# Allegro board L60_replayed.brd
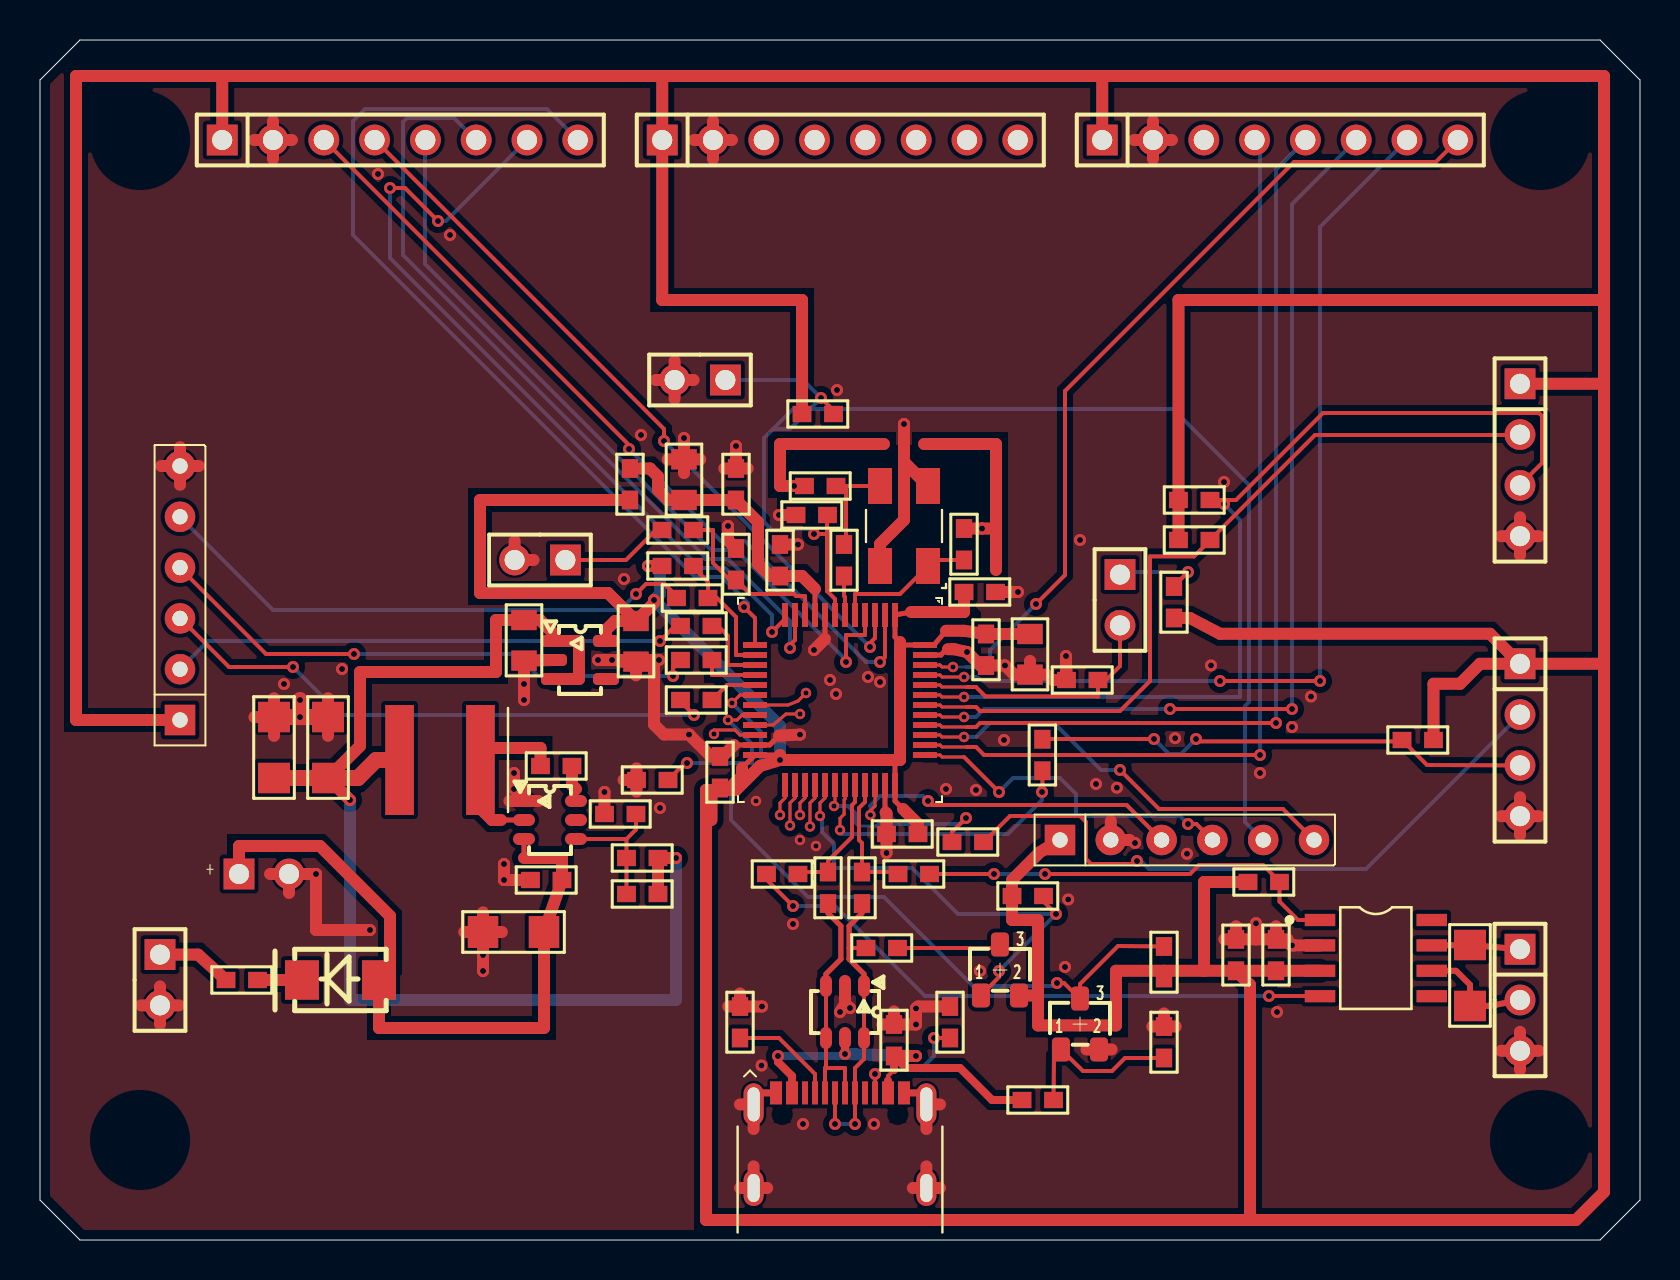
[diagram p0: board, top side]
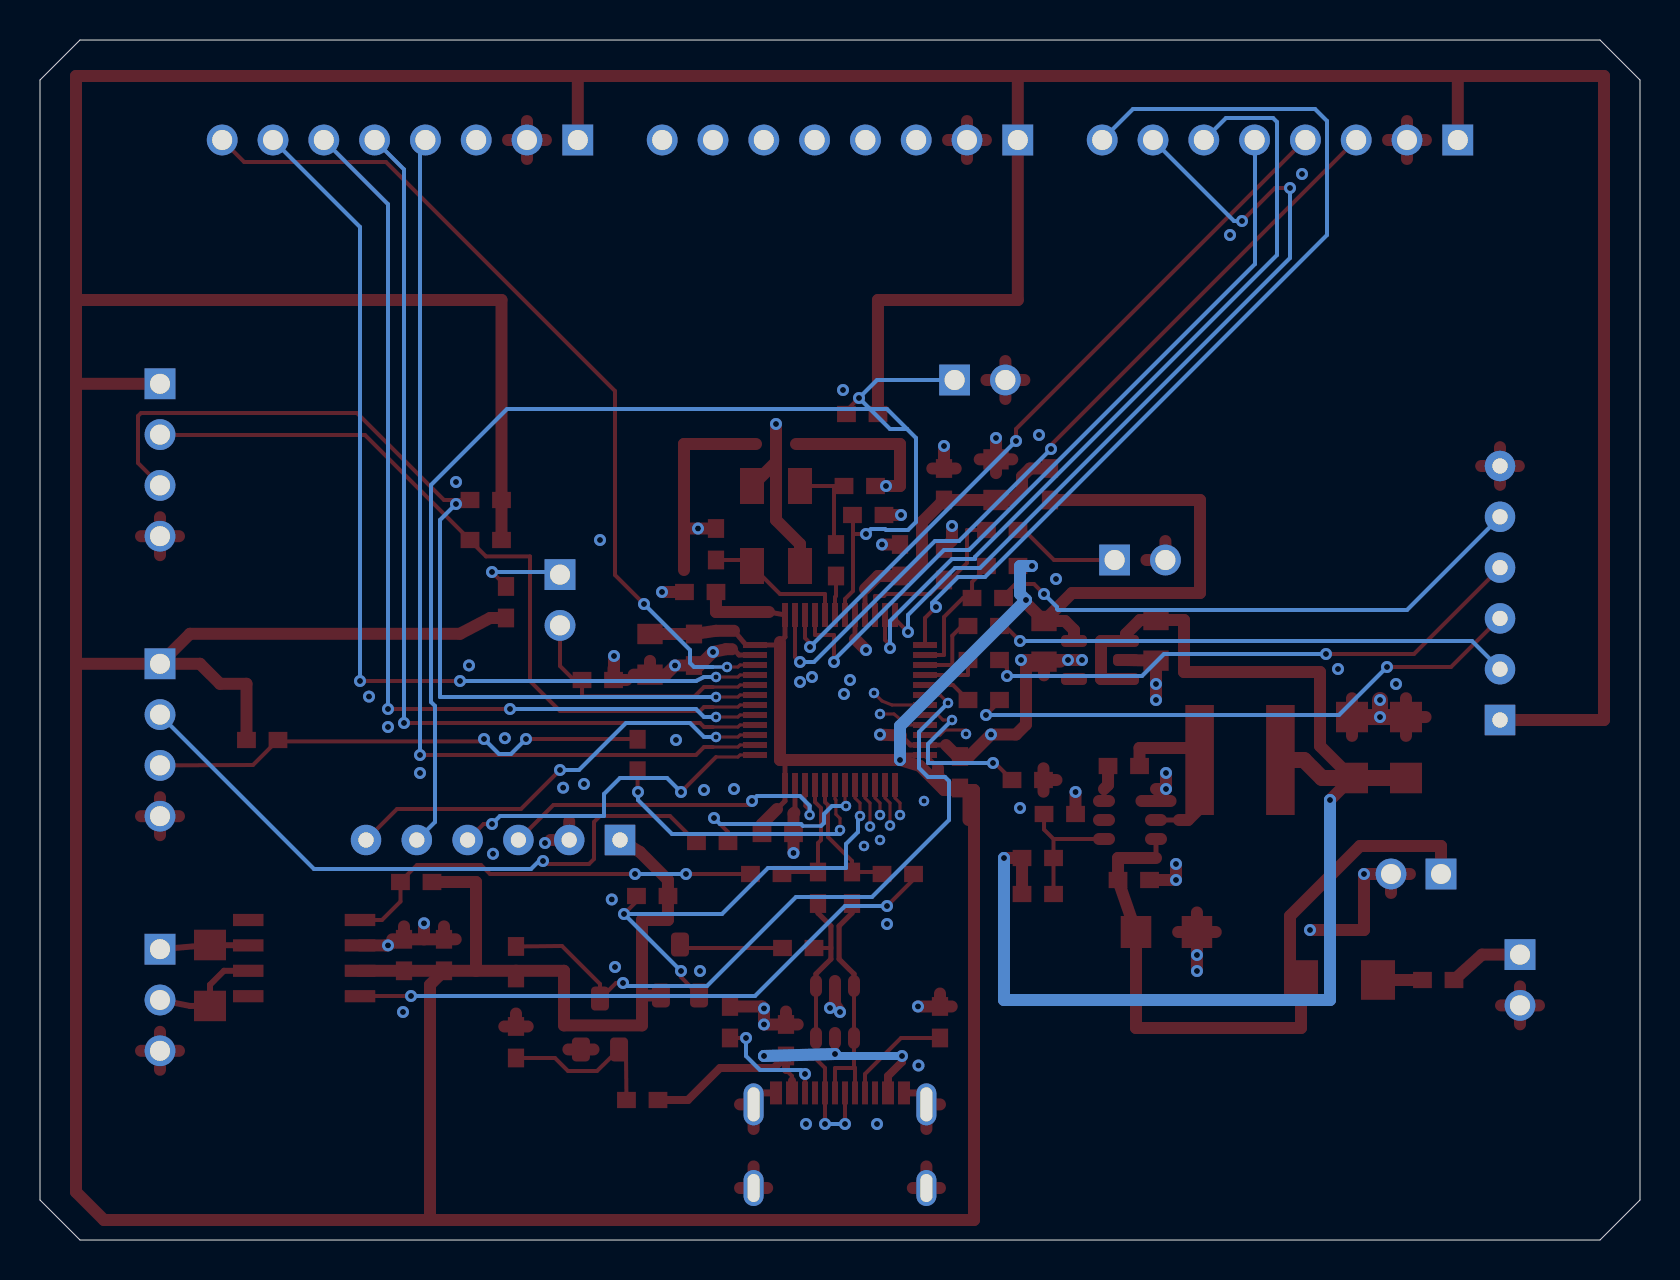
[diagram p1: board, bottom side, seen from below]

Outline 80 x 60 mm; copper layers: TOP, L2, L3, BOTTOM. Coordinates in mm from the lower left corner of the outline.
Outline path: 0,58 0,2 2,0 78,0 80,2 80,58 78,60 2,60 0,58

## Design rules (mm)
constraint set DEFAULT: 
net group DP_CAN_BUS: nets CAN_H CAN_L
net group DP_USB_MCU_SIDE: nets PA11_SHARED PA12_SHARED
net group NC_SWITCHING_E: nets BUCK_BOOT BUCK_SW
net group DP_USB_CONNECTOR: nets USB_DM
net group HI_USB_DP_P_4L: nets USB_DP
net group HI_VDDA_P: nets VDDA
net group NC_ANALOG_SENSITIVE_E: nets ADC0 ADC_IN BUCK_FB
net group NC_DIGITAL_GENERAL_E: nets BOOT0 BOOT1 BOOT_SERVICE CAN_RXD CAN_TXD GPIO_PA1 GPIO_PA2 GPIO_PA3 GPIO_PA15 GPIO_PB1 GPIO_PB4 GPIO_PB5 GPIO_PB8 GPIO_PB9 GPIO_PB10 GPIO_PB11 GPIO_PB12 GPIO_PB13 GPIO_PB14 GPIO_PB15 GPIO_PC13 GPIO_PC14 GPIO_PC15 I2C_SCL I2C_SDA NRST PA4_SPI_NSS PA5_SPI_SCK PA6_SPI_MISO PA7_SPI_MOSI PA9_UART_TX PA10_UART_RX SPI_MISO SPI_MOSI SPI_NSS SPI_SCK SWCLK SWDIO SWO UART_RX UART_TX USB_ATTACH_N USB_PULLUP_SRC VBUS_GATE VBUS_PRESENT_N
net group NC_OSCILLATOR_E: nets OSC_IN OSC_OUT XTAL_OUT
net group NC_POWER_INPUT_E: nets VIN_FUSED VIN_PROT VIN_RAW
net group NC_POWER_LV_E: nets V5
net group NC_USB_AUX_E: nets USB_CC1 USB_CC2 USB_VBUS

## Placement (name value [footprint] x y rotation side)
C1  47uF  [DE_CAPRADIAL_6D3_P2D5]  11.2 18.3 0 top
C2  22uF  [1206]  25.2 15.4 180 top
C3  100nF  [0603]  26.2 18 180 top
C4  100nF  [0603]  26.7 23.7 180 top
C5  22uF  [1206]  14.4 23.1 90 top
C6  22uF  [1206]  11.7 23.1 90 top
C7  75pF  [0603]  31 17.3 180 top
C8  2.2uF  [0805]  24.2 31 270 top
C9  4.7uF  [0805]  29.8 30.95 270 top
C10  100nF  [0603]  42.7 9.1 90 top
C11  100nF  [0603]  61.8 13.36 90 top
C12  1uF  [0603]  59.8 13.36 90 top
C13  100nF  [0603]  34 22.5 90 top
C14  100nF  [0603]  44 20.3 180 top
C15  100nF  [0603]  47.3 30.4 270 top
C16  10uF  [0805]  49.5 30.3 270 top
C17  100nF  [0603]  46.1 32.4 0 top
C18  10nF  [0603]  37 33.1 90 top
C19  100nF  [0603]  34.8 36.9 90 top
C20  2.2uF  [0805]  32.2 37 90 top
C21  100nF  [0603]  39.48 36.25 180 top
C22  16pF  [0603]  46.2 33.9 90 top
C23  16pF  [0603]  39.9 37.7 180 top
C24  100nF  [0603]  34.8 32.9 90 top
D1  SS14  [DO-214AC_SMA]  15 13 90 top
F1  500mA  [0603]  9.2 13 0 top
J1  9-16V  [PIN02_2D54MM_1X2]  6 13 0 top
J2  USB-C USB2 DEVICE  [L10_GCT_USB4105_GF_A_12LAND]  40 3.67 0 top
J3  CAN  [PIN03_2D54MM_1X3]  74 12 0 top
J4  3V3  [PIN04_2D54MM_1X4]  74 25 0 top
J5  3V3  [PIN04_2D54MM_1X4]  74 39 0 top
J6  3V3  [PIN06_2D54MM_1X6]  7 26 90 top
J7  RESET_SHUNT  [PIN02_2D54MM_1X2]  33 43 270 top
J8  BOOT0_SERVICE  [PIN02_2D54MM_1X2]  54 32 0 top
J9  SWD_LOCAL_1X6  [PIN06_2D54MM_1X6]  51 20 0 top
J10  ADC_0_TO_3V0  [PIN02_2D54MM_1X2]  25 34 270 top
J11  GPIO_3V3  [PIN08_2D54MM_1X8]  18 55 90 top
J12  GPIO_3V3  [PIN08_2D54MM_1X8]  40 55 90 top
J13  GPIO_3V3  [PIN08_2D54MM_1X8]  62 55 90 top
L1  15uH +/-20%  [DE_XAL6060_2LAND]  20 24 0 top
NOREF  -  [unnamed]  5 55 0 top
NOREF#2  -  [unnamed]  75 5 0 top
NOREF#3  -  [unnamed]  5 5 0 top
NOREF#4  -  [unnamed]  75 55 0 top
Q1  2N7002  [SOT23-3]  52 10.8 0 top
Q2  DMP2035U  [SOT23-3]  48 13.5 0 top
R1  100k  [0603]  31 19.1 180 top
R2  13.5k  [0603]  29.9 21.3 180 top
R3  5.1k  [0603]  35 10 90 top
R4  5.1k  [0603]  45.5 10 90 top
R5  22R  [0603]  41.1 18.5 270 top
R6  22R  [0603]  39.4 18.5 270 top
R7  10k  [0603]  49 7 0 top
R8  1M  [0603]  56.2 9 90 top
R9  10k  [0603]  56.2 13 90 top
R10  100k  [0603]  48.5 17.2 0 top
R11  1.5k  [0603]  42.98 14.6 180 top
R12  0R  [0603]  42.8 18.3 0 top
R13  0R  [0603]  38 18.3 180 top
R14  10k  [0603]  60.3 17.9 0 top
R15  120R  [1206]  71.5 14.75 270 top
R16  33R  [0603]  45.5 19.9 0 top
R17  0R  [0603]  50.12 23.36 90 top
R18  10k  [0603]  68 25 0 top
R19  2.2k  [0603]  56.82 35 0 top
R20  2.2k  [0603]  56.82 37 0 top
R21  33R  [0603]  33.7 30.7 180 top
R22  33R  [0603]  33.7 27 180 top
R23  33R  [0603]  33.5 32.1 180 top
R24  0R  [0603]  33.7 29 180 top
R25  10k  [0603]  31 33.7 0 top
R26  0R  [0603]  29.5 36.9 90 top
R27  10k  [0603]  38 41.3 0 top
R28  10k  [0603]  53 28 180 top
R29  10k  [0603]  31.5 23 180 top
R30  1k  [0603]  56.7 31 90 top
R31  0R  [0603]  40.2 33.1 90 top
R32  1k  [0603]  31 35.5 0 top
U1  STM32F103C8T6  [L09_STM32F103C8_LQFP48]  40 27 270 top
U2  TPS54202  [SOT23-6]  25.5 21 270 top
U3  TLV75533P  [SOT23-5]  27 29 0 top
U4  USBLC6-2SC6  [SOT23-6]  40.25 11.4 180 top
U5  TCAN332  [SO8]  64 16 0 top
Y1  8MHz  [DE_ABM3B_5032]  43.2 35.7 90 top

## Library data of the parts
C1 = DE_CAP_POL
C2 C5 C6 = DE_CAP1206
C3 C4 C7 C10-C15 C17-C19 C21-C24 = DE_CAP
C8 C9 C16 C20 = DE_CAP0805
D1 = DE_SS14_E3_61T
F1 = DE_FUSE
J1 J7 J8 J10 = DE_HEADER2
J2 = DE_USB4105_GF_A
J3 = DE_HEADER3
J4 J5 = DE_HEADER4
J6 J9 = DE_HEADER6
J11-J13 = DE_HEADER8
L1 = DE_XAL6060_153MEC
Q1 = DE_2N7002
Q2 = DE_DMP2035U_7
R1-R14 R16-R32 = DE_RES
R15 = DE_RES1206
U1 = DE_STM32F103C8T6
U2 = DE_TPS54202DDCR
U3 = DE_TLV75533PDBVR
U4 = DE_USBLC6_2SC6
U5 = DE_TCAN332DR
Y1 = DE_XTAL_ABM3B

## Footprints (pads in the part's own frame, mm; a bottom-side part is the same pattern mirrored in y, then rotated)
0603
  rect 0.94x0.813 smd: 1(0.102,0) 2(1.676,0)
0805
  rect 1.016x1.27 smd: 1(0,0) 2(2.032,0)
1206
  rect 1.524x1.6 smd: 1(0,0) 2(3.048,0)
DE_ABM3B_5032
  rect 1.8x1.2 smd: 1(-2,-1.2) 2(2,-1.2) 3(2,1.2) 4(-2,1.2)
DE_CAPRADIAL_6D3_P2D5
  rect 1.54x1.54 hole 1: 1(-1.25,0)
  round 1.54 hole 1: 2(1.25,0)
DE_XAL6060_2LAND
  rect 1.43x5.5 smd: 1(2.02,0) 2(-2.02,0)
DO-214AC_SMA
  rect 1.981x1.702 smd: 1(0,-1.95) 2(0,1.9)
L09_STM32F103C8_LQFP48
  rect 1.2x0.3 smd: 1(-4.25,2.75) 2(-4.25,2.25) 3(-4.25,1.75) 4(-4.25,1.25) 5(-4.25,0.75) 6(-4.25,0.25) 7(-4.25,-0.25) 8(-4.25,-0.75) 9(-4.25,-1.25) 10(-4.25,-1.75) 11(-4.25,-2.25) 12(-4.25,-2.75) 25(4.25,-2.75) 26(4.25,-2.25) 27(4.25,-1.75) 28(4.25,-1.25) 29(4.25,-0.75) 30(4.25,-0.25) 31(4.25,0.25) 32(4.25,0.75) 33(4.25,1.25) 34(4.25,1.75) 35(4.25,2.25) 36(4.25,2.75)
  rect 0.3x1.2 smd: 13(-2.75,-4.25) 14(-2.25,-4.25) 15(-1.75,-4.25) 16(-1.25,-4.25) 17(-0.75,-4.25) 18(-0.25,-4.25) 19(0.25,-4.25) 20(0.75,-4.25) 21(1.25,-4.25) 22(1.75,-4.25) 23(2.25,-4.25) 24(2.75,-4.25) 37(2.75,4.25) 38(2.25,4.25) 39(1.75,4.25) 40(1.25,4.25) 41(0.75,4.25) 42(0.25,4.25) 43(-0.25,4.25) 44(-0.75,4.25) 45(-1.25,4.25) 46(-1.75,4.25) 47(-2.25,4.25) 48(-2.75,4.25)
L10_GCT_USB4105_GF_A_12LAND
  round 0 hole 0.65 unplated: (-2.89,2.605) (2.89,2.605)
  rect 0.6x1.15 smd: A1_B12(-3.2,3.68) A4_B9(-2.4,3.68) B1_A12(3.2,3.68) B4_A9(2.4,3.68)
  rect 0.3x1.15 smd: A5(-1.25,3.68) A6(-0.25,3.68) A7(0.25,3.68) A8(1.25,3.68) B5(1.75,3.68) B6(0.75,3.68) B7(-0.75,3.68) B8(-1.75,3.68)
  oval 1x2.1 hole 0.6x1.7: SH1(-4.32,3.105) SH2(4.32,3.105)
  oval 1x1.8 hole 0.6x1.4: SH3(-4.32,-1.075) SH4(4.32,-1.075)
PIN02_2D54MM_1X2
  rect 1.54x1.54 hole 1: 1(0,1.27)
  round 1.54 hole 1: 2(0,-1.27)
PIN03_2D54MM_1X3
  rect 1.54x1.54 hole 1: 1(0,2.54)
  round 1.54 hole 1: 2(0,0) 3(0,-2.54)
PIN04_2D54MM_1X4
  rect 1.54x1.54 hole 1: 1(0,3.81)
  round 1.54 hole 1: 2(0,1.27) 3(0,-1.27) 4(0,-3.81)
PIN06_2D54MM_1X6
  rect 1.524x1.524 hole 0.762: 1(0,0)
  round 1.524 hole 0.762: 2(2.54,0) 3(5.08,0) 4(7.62,0) 5(10.16,0) 6(12.7,0)
PIN08_2D54MM_1X8
  rect 1.54x1.54 hole 1: 1(0,8.89)
  round 1.54 hole 1: 2(0,6.35) 3(0,3.81) 4(0,1.27) 5(0,-1.27) 6(0,-3.81) 7(0,-6.35) 8(0,-8.89)
SO8
  rect 1.524x0.61 smd: 1(0,0) 2(0,-1.27) 3(0,-2.54) 4(0,-3.81) 5(5.588,-3.81) 6(5.588,-2.54) 7(5.588,-1.27) 8(5.588,0)
SOT23-3
  rrect 0.9x1.2 smd: 1(-0.953,-1.272) 2(0.953,-1.272) 3(0,1.272)
SOT23-5
  rrect 1.3x0.6 smd: 1(-1.3,0.95) 2(-1.3,0) 3(-1.3,-0.95) 4(1.3,-0.95) 5(1.3,0.95)
SOT23-6
  oval 0.6x1.1 smd: 1(-0.95,-1.3) 2(0,-1.3) 3(0.95,-1.3) 4(0.95,1.3) 5(0,1.3) 6(-0.95,1.3)
unnamed
  round 0 hole 2 unplated: (0,0)

## Nets
GND: C1.2 C2.2 C3.2 C5.2 C6.2 C8.2 C9.2 C10.2 C11.2 C12.2 C13.2 C14.2 C15.2 C16.2 C17.2 C18.2 C19.2 C20.2 C21.2 C22.2 C23.2 C24.2 J1.2 J2.A1_B12 J2.B1_A12 J2.SH1 J2.SH2 J2.SH3 J2.SH4 J3.3 J4.4 J5.4 J6.6 J7.2 J9.2 J10.2 J11.2 J12.2 J13.2 Q1.2(S) R2.2 R3.2 R4.2 R8.2 R28.2 R29.2 U1.8 U1.23 U1.35 U1.47(VSS_3) U2.1 U3.2 U4.2 U5.2 Y1.2 Y1.4
V3V3: C9.1 C11.1 C12.1 C13.1 C14.1 C15.1 C16.1 C17.1 J4.1 J5.1 J6.1 J9.1 J11.1 J12.1 J13.1 Q2.2(S) R9.1 R10.1 R14.1 R18.2 R19.1 R20.1 R25.1 R26.1 R27.1 R30.1 U1.1 U1.24 U1.36 U1.48 U3.5(OUT) U5.3(VCC)
V5: C5.1 C6.1 C7.1 C8.1 L1.2 R1.1 U3.1 U3.3
VBUS_GATE: Q1.1 R7.2 R8.1
VBUS_PRESENT_N: Q1.3 R9.2 U1.18
VDDA: C18.1 C19.1 C20.1 R26.2 U1.9
VIN_FUSED: D1.2 F1.2
VIN_PROT: C1.1(P) C2.1 C3.1 D1.1(K) U2.3(VIN)
VIN_RAW: F1.1 J1.1
ADC0: C24.1 R32.2 U1.10
ADC_IN: J10.1 R32.1
BOOT0: J8.2 R28.1 U1.44
BOOT1: R29.1 U1.20
BOOT_SERVICE: J8.1 R30.2
BUCK_BOOT: C4.1 U2.6
BUCK_FB: C7.2 R1.2 R2.1 U2.4
BUCK_SW: C4.2 L1.1(SW_END) U2.2
CAN_H: J3.1 R15.1 U5.7
CAN_L: J3.2 R15.2 U5.6
CAN_RXD: R13.2 U5.4
CAN_TXD: R12.2 R14.2 U5.1
GPIO_PA1: J11.6 U1.11
GPIO_PA2: J11.7 U1.12
GPIO_PA3: J11.8 U1.13
GPIO_PA15: J13.4 U1.38
GPIO_PB1: J12.3 U1.19
GPIO_PB4: J13.5 U1.40
GPIO_PB5: J13.6 U1.41
GPIO_PB8: J13.7 U1.45
GPIO_PB9: J13.8 U1.46
GPIO_PB10: J12.4 U1.21
GPIO_PB11: J12.5 U1.22
GPIO_PB12: J12.6 U1.25
GPIO_PB13: J12.7 U1.26
GPIO_PB14: J12.8 U1.27
GPIO_PB15: J13.3 U1.28
GPIO_PC13: J11.3 U1.2
GPIO_PC14: J11.4 U1.3
GPIO_PC15: J11.5 U1.4
I2C_SCL: J5.2 R19.2 U1.42
I2C_SDA: J5.3 R20.2 U1.43
NRST: C21.1 J7.1 J9.5 R27.2 U1.7
OSC_IN: C22.1 U1.5 Y1.1
OSC_OUT: R31.1 U1.6
PA4_SPI_NSS: R23.1 R25.2 U1.14
PA5_SPI_SCK: R21.1 U1.15
PA6_SPI_MISO: R24.1 U1.16
PA7_SPI_MOSI: R22.1 U1.17
PA9_UART_TX: R16.1 U1.30
PA10_UART_RX: R17.1 U1.31
PA11_SHARED: R6.1 R13.1 U1.32
PA12_SHARED: R5.1 R12.1 U1.33
SPI_MISO: J6.4 R24.2
SPI_MOSI: J6.3 R22.2
SPI_NSS: J6.5 R23.2
SPI_SCK: J6.2 R21.2
SWCLK: J9.4 U1.37
SWDIO: J9.3 U1.34
SWO: J9.6 U1.39
UART_RX: J4.3 R17.2 R18.1
UART_TX: J4.2 R16.2
USB_ATTACH_N: Q2.1 R10.2 U1.29
USB_CC1: J2.A5 R3.1
USB_CC2: J2.B5 R4.1
USB_DM: J2.A7 J2.B7 R6.2 U4.3 U4.4
USB_DP: J2.A6 J2.B6 R5.2 R11.2 U4.1 U4.6
USB_PULLUP_SRC: Q2.3 R11.1
USB_VBUS: C10.1 J2.A4_B9 J2.B4_A9(VBUS2) R7.1 U4.5(VBUS)
XTAL_OUT: C23.1 R31.2 Y1.3(X2)

Pads without a net: J2 A8 B8; U2 5; U3 4; U5 5 8

## Via types
v1: diameter 0.52, hole 0.26, TOP to BOTTOM, 21 vias
v2: diameter 0.6, hole 0.3, TOP to BOTTOM, 129 vias

## Routing (per net, layer and track width the routed paths; a pad name or vN(x,y) marks a point on that pad's centre or on a via; arc(x,y) is an arc through that point)
GND: length 234.7
  TOP w0.25: 34.7,24.75 U1.23 36.48,24.75 36.95,25.22 ; 39.25,30.05 U1.8 ; 42.28,21.37 42.25,21.4 U1.35 ; U1.47 45.05,29.25 45.3,29.54 45.4,29.54 ; 24.2,22.55 U2.1
  TOP w0.35: 44.1,7.36 J2.B1_A12 ; 35.9,7.36 J2.A1_B12
  TOP w0.6: C16.2 49.5,28.95 ; C16.2 48.71,28.27 v2(48.25,28.73) C15.2 47.02,28.73 v2(46.35,29.4) 45.7,29.54 45.4,29.54 ; C16.2 50.31,28.27 ; 29.8,29 30.7,29 30.7,25.77 31.2,25.27 v2(32.45,25.27) 33.55,24.17 C13.2 34,24.05 34.7,24.75 ; 29.8,29 C9.2 ; 29.8,29 v2(28.6,29) v2(27.9,29) ; 14.4,27.09 C5.2 14.4,25.21 ; 24.2,22.55 v2(23.7,22.55) v2(23.7,23.35) ; 62.7,14.73 v2(62.6,14.73) ; 62.7,14.73 U5.2 ; 62.7,14.73 C11.2 ; v2(42.33,19.35) C14.2 42.33,21.32 42.28,21.37 ; 28.99,28.92 C9.2 ; C9.2 29.8,28.23 ; C9.2 30.61,28.92 ; J2.SH1 35.68,7.36 35.9,7.36 ; J2.SH1 35,6.78 ; J2.SH1 35.68,5.55 ; 32.2,38.35 C20.2 ; C20.2 33.01,39.03 ; C20.2 v2(32.2,40.1) ; C20.2 31.39,39.03 ; v2(34.4,35.7) 34.4,34.97 C24.2 ; J3.3 74.95,9.46 ; J3.3 74,10.41 ; J3.3 74,8.51 ; J3.3 73.05,9.46 ; 74,20.24 J4.4 ; J4.4 74.95,21.19 ; J4.4 73.05,21.19 ; J4.4 74,22.14 ; C11.2 60.8,15.03 ; C11.2 61.8,15.68 ; C11.2 62.38,15.03 ; 60.8,15.03 v2(60.8,15.83) ; 60.8,15.03 C12.2 ; C22.2 v2(47.1,35.57) 47.8,35.57 ; v2(23.2,18.8) v2(23.2,18) C3.2 ; 34.42,11.68 R3.2 ; R3.2 35,12.32 ; R3.2 v2(36.1,11.68) ; J2.SH2 44.32,7.36 44.1,7.36 ; J2.SH2 45,6.78 ; J2.SH2 44.32,5.55 ; C10.2 42.7,11.42 ; C10.2 42.12,10.78 ; C10.2 v2(43.8,10.78) v2(43.8,11.58) 43.9,11.68 R4.2 ; 5.05,11.73 J1.2 ; J1.2 6,12.68 ; J1.2 6,10.78 ; J1.2 6.95,11.73 ; R28.2 51.3,28.02 v2(51.3,29.2) ; R28.2 51.32,28.58 ; R28.2 50.68,28 ; C2.2 v2(22.15,14.25) v2(22.15,13.45) ; C2.2 23.09,15.4 ; C2.2 21.21,15.4 ; C2.2 22.15,16.38 ; 10.7,55 J11.2 ; J11.2 11.65,54.05 ; J11.2 11.65,55.95 ; J11.2 12.6,55 ; J2.SH3 35.68,3.68 ; J2.SH3 36.36,2.6 ; J2.SH3 35,2.6 ; 32.7,55 J12.2 ; J12.2 33.65,54.05 ; J12.2 34.6,55 ; J12.2 33.65,55.95 ; 24.68,34 J10.2 23.73,34.95 ; 11.7,25.21 C6.2 ; C6.2 10.72,26.15 ; C6.2 11.7,27.09 ; 42.2,39.8 37,39.8 37,37.7 v2(37.7,37.7) C23.2 ; C12.2 59.22,15.03 ; C12.2 59.8,15.68 ; 74,34.24 J5.4 ; J5.4 74,36.14 ; J5.4 73.05,35.19 ; J5.4 74.95,35.19 ; 53.58,9.53 Q1.2 52.32,9.53 ; 43.64,2.6 J2.SH4 ; J2.SH4 45,2.6 ; J2.SH4 44.32,3.68 ; 47.8,35.57 47.8,33.5 ; 47.8,35.57 47.8,39.8 44.2,39.8 ; J7.2 31.73,43.95 ; J7.2 30.78,43 ; J7.2 32.68,43 ; J7.2 31.73,42.05 ; v2(38.7,29.5) 39.25,30.05 ; 12.45,17.35 C1.2 ; C1.2 v2(13.8,18.3) 13.8,15.5 v2(16.5,15.5) ; C1.2 11.5,18.3 ; J13.2 56.6,55 ; J13.2 55.65,55.95 ; J13.2 55.65,54.05 ; J13.2 54.7,55 ; v2(40,11.4) 40.25,11.8 ; 40.25,11.8 U4.2 ; 40.25,11.8 v2(40.5,11.6) ; 29.83,22.42 R29.2 ; R29.2 29.83,23.58 ; R29.2 29.18,23 ; 43.2,38.9 Y1.2 ; 43.2,38.9 v2(43.2,40.8) ; 43.2,38.9 43.2,36 42,34.8 Y1.4 ; R8.2 56.78,10.68 ; R8.2 56.2,11.32 ; R8.2 55.62,10.68 ; 23.47,21.95 U2.1 24.93,21.95 ; U3.2 C8.2 v2(24.2,27.8) v2(24.2,27) ; C17.2 v2(48.9,32.4) ; C19.2 35.38,38.57 ; C19.2 34.22,38.57 ; C19.2 v2(34.8,39.7) ; 53.54,20.94 J9.2 54.48,20 ; C21.2 v2(36.95,36.25) ; v2(38,25.27) 36.95,25.22 ; C18.2 v2(37.9,34.77) ; 7,37.76 J6.6 ; J6.6 7,39.64 ; J6.6 7.94,38.7 ; J6.6 6.06,38.7 ; R2.2 v2(28.22,22.4)
  TOP w0.8: C5.2 v2(13,26.15) ; v2(13,26.15) v2(13,27) ; v2(13,26.15) C6.2
  L2 w0.6: J11.2 12.6,55 ; J11.2 11.65,55.95 ; J11.2 10.7,55 ; J11.2 11.65,54.05 ; 44.32,1.52 J2.SH4 ; J2.SH4 44.32,3.68 ; J2.SH4 45,2.6 ; J2.SH4 43.64,2.6 ; 6.06,38.7 J6.6 ; J6.6 7,37.76 ; J6.6 7,39.64 ; J6.6 7.94,38.7 ; C1.2 13.4,18.3 ; C1.2 12.45,17.35 ; C1.2 11.5,18.3 ; C1.2 12.45,19.25 ; J2.SH2 44.32,8.01 ; J2.SH2 43.64,6.78 ; J2.SH2 44.32,5.55 ; J2.SH2 45,6.78 ; J4.4 74.95,21.19 ; J4.4 74,20.24 ; J4.4 74,22.14 ; J4.4 73.05,21.19 ; 5.05,11.73 J1.2 ; J1.2 6,10.78 ; J1.2 6,12.68 ; J1.2 6.95,11.73 ; 23.73,33.05 J10.2 ; J10.2 23.73,34.95 ; J10.2 22.78,34 ; J10.2 24.68,34 ; J3.3 74.95,9.46 ; J3.3 74,8.51 ; J3.3 73.05,9.46 ; J3.3 74,10.41 ; 55.65,54.05 J13.2 ; J13.2 56.6,55 ; J13.2 55.65,55.95 ; J13.2 54.7,55 ; 35,2.6 J2.SH3 ; J2.SH3 36.36,2.6 ; J2.SH3 35.68,3.68 ; J2.SH3 35.68,1.52 ; J12.2 34.6,55 ; J12.2 33.65,54.05 ; J12.2 33.65,55.95 ; J12.2 32.7,55 ; J5.4 74,36.14 ; J5.4 74,34.24 ; J5.4 74.95,35.19 ; J5.4 73.05,35.19 ; 35.68,5.55 J2.SH1 ; J2.SH1 35,6.78 ; J2.SH1 36.36,6.78 ; J2.SH1 35.68,8.01 ; 31.73,42.05 J7.2 ; J7.2 30.78,43 ; J7.2 32.68,43 ; J7.2 31.73,43.95 ; J9.2 54.48,20 ; J9.2 52.6,20 ; J9.2 53.54,20.94 ; J9.2 53.54,19.06
  vias: v1(35.8,21.95) v1(38,20) v1(38.8,19.7) v2(12.2,27.8) v2(15.1,28.55) v2(16.9,53.3) v2(20.5,50.25) v2(29.2,33.05) v2(30.05,40.25) v2(30.95,29) v2(31,21.6) v2(36.08,8.72) v2(37.65,15.8) v2(38.15,5.8) v2(39.5,28) v2(39.8,27.3) v2(39.85,42.5) v2(41.4,28.15) v2(41.7,5.8) v2(42,27.9) v2(45.3,22.55) v2(46.8,22.5) v2(47,13.45) v2(48.2,25) v2(51.25,13.65) v2(51.41,17.03) v2(52,35) v2(52.8,22.8) v2(53.84,22.61) v2(54.75,19.85) v2(56.76,25.09) v2(57.35,19.31) v2(58.55,28.73) v2(59.2,37.9) v2(61,23.35) v2(61.85,11.4) v2(62.6,25.65) v2(63.55,27.17)
V3V3: length 486.7
  TOP w0.25: 43,29.75 U1.48 44.7,29.75 45.3,30.46 ; 37,24.25 U1.24 35.1,23.6 ; 43.15,21.55 42.75,21.95 U1.36 42.75,24 ; 43.55,31.4 U1.1 42.75,30.15 43,29.9
  TOP w0.6: 49.9,12.23 Q2.2 ; 49.9,12.23 49.9,10.73 53.8,10.73 53.8,13.46 56.2,13.46 ; 49.9,12.23 49.9,16 48.6,16 R10.1 48.6,18 50,19.4 J9.1 ; v2(37,24) 36,23.7 34.8,22.5 33.3,22.5 ; v2(37,24) 37,24.25 ; v2(37,24) 43,24 43,29.9 ; C16.1 C15.1 46.2,30.46 45.3,30.46 ; R18.2 69.68,27.81 71,27.81 72,28.81 J4.1 ; 78.2,47 78.2,42.81 ; 78.2,47 78.2,58.2 53.11,58.2 ; 78.2,47 56.93,47 R20.1 R19.1 ; 78.2,42.81 78.2,28.81 ; 78.2,42.81 J5.1 ; C17.1 46.2,31.4 43.55,31.4 ; 31.11,58.2 J12.1 31.11,47 38.1,47 R27.1 ; 31.11,58.2 53.11,58.2 ; 31.11,58.2 9.11,58.2 ; 58.2,13.46 56.2,13.46 ; 58.2,13.46 58.2,17.9 R14.1 ; 58.2,13.46 C12.1 ; 56.2,13.46 R9.1 ; R26.1 22,37 22,32.35 28.4,32.35 C9.1 ; 33.3,22.5 33.3,1 60.5,1 ; 33.3,22.5 33.57,22.23 33.57,21 ; J6.1 1.8,26 1.8,58.2 9.11,58.2 ; C12.1 C11.1 U5.3 ; C12.1 60.5,12.76 60.5,1 ; 43.15,21.55 43.9,20.8 C14.1 ; 78.2,28.81 78.2,2.4 76.8,1 60.5,1 ; 78.2,28.81 J4.1 ; J4.1 72.5,30.31 59,30.31 57.49,31.1 R30.1 ; C9.1 30.7,31.85 v2(30.7,32) ; C9.1 28.75,30.95 28.3,30.5 U3.5 ; v2(30.4,33.7) R25.1 ; 53.11,58.2 J13.1 ; 9.11,58.2 J11.1 ; C13.1 34.5,22.6 35.1,23.2 35.1,23.6
  L3 w0.6: J11.1 9.11,55.95 ; J11.1 8.16,55 ; J11.1 9.11,54.05 ; J11.1 10.06,55 ; J4.1 74,29.76 ; J4.1 74,27.86 ; J4.1 74.95,28.81 ; J4.1 73.05,28.81 ; 6.06,26 J6.1 ; J6.1 7,26.94 ; J6.1 7,25.06 ; J6.1 7.94,26 ; J5.1 74,43.76 ; J5.1 74.95,42.81 ; J5.1 74,41.86 ; J5.1 73.05,42.81 ; 52.16,55 J13.1 ; J13.1 54.06,55 ; J13.1 53.11,54.05 ; J13.1 53.11,55.95 ; 51,19.06 J9.1 ; J9.1 51,20.94 ; J9.1 51.94,20 ; J9.1 50.06,20 ; J12.1 32.06,55 ; J12.1 31.11,54.05 ; J12.1 31.11,55.95 ; J12.1 30.16,55
  BOTTOM w0.6: v2(37,24) 37,25.7 v2(30.7,32) 31,32.3 31,33.7 v2(30.4,33.7)
V5: length 67.6
  TOP w0.6: v2(15.5,22) C5.1 16,24.7 16,28.4 22.8,28.4 22.8,31 C8.1 25,31 25.7,30.3 U3.1 26.95,29.95 26.95,28.05 U3.3 ; C7.1 R1.1 v2(31.8,19.1)
  TOP w0.8: C6.1 C5.1 15.9,23.1 16.8,24 L1.2
  BOTTOM w0.6: v2(31.8,19.1) 31.8,12 15.5,12 v2(15.5,22)
VBUS_GATE: length 8.5
  TOP w0.2: R7.2 50.7,9.2 Q1.1 52.15,8.45 53.6,8.45 54.25,9.1 R8.1
VBUS_PRESENT_N: length 35.9
  TOP w0.16: v1(34.6,26.85) 35,27.25 U1.18
  TOP w0.2: v2(50.85,12.85) 51.2,12.85 52,12.05 Q1.3 52,12.8 53.9,14.7 R9.2
  BOTTOM w0.2: v2(50.85,12.85) 50.7,12.7 46.65,12.7 42.2,17.15 38.4,17.15 34.55,21 34.55,22.95 34.75,23.15 35.6,23.15 36.05,23.6 36.05,25.4 v1(34.6,26.85)
VDDA: length 14.7
  TOP w0.25: U1.9 38.75,32.55
  TOP w0.6: R26.2 30.5,38.57 30.9,38.17 30.9,37.5 31.4,37 C20.1 C19.1 35.9,35.9 35.9,33.8 36.5,33.2 C18.1 38.1,33.2 38.75,32.55
VIN_FUSED: length 2.2
  TOP w0.6: F1.2 D1.2
VIN_PROT: length 36
  TOP w0.25: U2.3 24.2,19.1
  TOP w0.6: 24.2,19.1 26.1,19.1 C3.1 C2.1 25.2,10.6 16.95,10.6 D1.1 17.5,13.55 17.5,16.2 14,19.7 9.95,19.7 C1.1
VIN_RAW: length 3.8
  TOP w0.6: F1.1 7.9,14.27 J1.1
ADC0: length 8.9
  TOP w0.2: U1.10 38.25,32.2 37.8,32.2 37.7,32.3 35.5,32.3 C24.1 34.5,33 33.65,33.85 33.65,35.5 R32.2
ADC_IN: length 5.5
  TOP w0.2: R32.1 30.8,35.5 29.3,34 J10.1
BOOT0: length 13.1
  TOP w0.16: 46.35,27.65 45.1,27.65 45,27.75 44.65,27.75
  TOP w0.2: 44.65,27.75 U1.44 ; 46.35,27.65 46.8,27.65 47.27,27.18 52.9,27.18 R28.1 53.3,28 54,28.7 J8.2
BOOT1: length 8.7
  TOP w0.16: v1(34.4,26) 34.85,26 35.1,26.25 U1.20
  TOP w0.2: v2(32.35,23.85) 32.25,23.85 R29.1
  BOTTOM w0.2: v2(32.35,23.85) 35.6,23.85 35.6,24.8 v1(34.4,26)
BOOT_SERVICE: length 4.5
  TOP w0.2: v2(57.4,33.4) 56.7,32.7 R30.2
  BOTTOM w0.2: J8.1 54,33.25 54.15,33.4 v2(57.4,33.4)
BUCK_BOOT: length 1.8
  TOP w0.25: U2.6 26.8,22.55
  TOP w0.6: 26.8,22.55 26.6,22.75 C4.1
BUCK_FB: length 6.7
  TOP w0.2: 29.32,20.05 R1.2 C7.2 ; 29.32,20.05 29.8,20.52 R2.1 ; 29.32,20.05 U2.4
BUCK_SW: length 9.3
  TOP w0.25: U2.2 23.05,21
  TOP w0.6: 23.05,21 22.6,21 22.02,21.58 L1.1 22.02,24.6 25.02,24.6 C4.2
CAN_H: length 4.4
  TOP w0.3: U5.7 R15.1 J3.1
CAN_L: length 5.8
  TOP w0.3: U5.6 70.8,13.46 71.5,12.76 R15.2 72.5,11.7 J3.2
CAN_RXD: length 30.4
  TOP w0.2: v2(61.45,12.2) 64,12.2 U5.4 ; R13.2 36.3,18.3 36.3,18.05 v2(37.65,16.7)
  BOTTOM w0.2: v2(37.65,16.7) 39.75,16.7 44.25,12.2 v2(61.45,12.2)
CAN_TXD: length 21.5
  TOP w0.2: R12.2 v2(47.7,18.3) ; U5.1 62.9,16 61.98,16.92 R14.2 62,17.9 61.15,18.75 57.95,18.75 57.5,18.3 v2(50.25,18.3)
  BOTTOM w0.2: v2(47.7,18.3) v2(50.25,18.3)
GPIO_PA1: length 40.9
  TOP w0.2: v2(37.5,29.6) 37.5,29.75 37.75,30 U1.11
  BOTTOM w0.2: v2(37.5,29.6) 37.5,30.95 34.4,34.05 33.25,34.05 33.25,34.15 18.15,49.25 18.15,55.9 18.35,56.1 20.7,56.1 21.8,55 J11.6
GPIO_PA2: length 41.2
  TOP w0.2: v2(36.6,30.4) 37.25,31.05 U1.12 ; v2(19.9,50.95) 18.25,52.6 v2(17.5,52.6)
  BOTTOM w0.2: J11.7 20.3,50.95 v2(19.9,50.95) ; v2(36.6,30.4) 36.6,31.25 34.25,33.6 33,33.6 17.5,49.1 v2(17.5,52.6)
GPIO_PA3: length 47.6
  TOP w0.2: v2(35.2,31.65) 35.75,31.1 U1.13
  BOTTOM w0.2: v2(35.2,31.65) 35.4,31.85 34.1,33.15 32.75,33.15 15.65,50.25 15.65,55.95 16.25,56.55 25.35,56.55 26.9,55 J11.8
GPIO_PA15: length 47.8
  TOP w0.16: 46.35,24.65 45.1,24.65 45,24.75 44.65,24.75
  TOP w0.2: 46.35,24.65 46.8,24.65 47.2,24.25 v2(61,24.25) ; 44.65,24.75 U1.38
  BOTTOM w0.2: J13.4 61,54.73 v2(61,24.25)
GPIO_PB1: length 2.8
  TOP w0.16: U1.19 37.4,26.75 37.9,26.95 v1(38.3,27.35)
GPIO_PB4: length 47.4
  TOP w0.16: 44.65,25.75 45,25.75 45.1,25.65 46.35,25.65
  TOP w0.2: 44.65,25.75 U1.40 ; 46.35,25.65 46.8,25.65 47,25.85 v2(61.8,25.85)
  BOTTOM w0.2: J13.5 61.8,53.53 v2(61.8,25.85)
GPIO_PB5: length 48.3
  TOP w0.16: U1.41 45,26.25 45.1,26.15 v1(46.2,26.15)
  TOP w0.2: v2(56.5,26.55) v2(62.6,26.55)
  BOTTOM w0.2: v1(46.2,26.15) 46.8,26.15 47.2,26.55 v2(56.5,26.55) ; v2(62.6,26.55) 62.6,51.79 J13.6
GPIO_PB8: length 48.7
  TOP w0.16: v1(46.2,28.15) 45.1,28.15 45,28.25 U1.45
  TOP w0.2: v2(59,27.95) v2(64,27.95)
  BOTTOM w0.2: v2(59,27.95) 47.2,27.95 46.8,28.15 v1(46.2,28.15) ; v2(64,27.95) 64,50.65 J13.7
GPIO_PB9: length 43.4
  TOP w0.16: v1(45.65,28.65) 45.1,28.65 45,28.75 U1.46
  TOP w0.2: v2(49.8,31.8) 51.25,33.25 51.25,42.45 62.7,53.9 69.79,53.9 J13.8
  BOTTOM w0.16: v1(45.65,28.65) 46.35,28.65
  BOTTOM w0.2: 46.35,28.65 47.3,28.65 47.5,28.85 47.5,29.5 v2(49.8,31.8)
GPIO_PB10: length 2.5
  TOP w0.16: U1.21 36.65,25.75 37.3,26.3 v1(38,26.3)
GPIO_PB11: length 2.4
  TOP w0.16: v1(33.7,25.3) 33.7,25.5 34.75,25.5 35,25.25 U1.22
GPIO_PB12: length 1.6
  TOP w0.16: U1.25 37.25,22.1 37,21.85 v1(37,21.25)
GPIO_PB13: length 2.1
  TOP w0.16: U1.26 37.75,22.1 37.5,21.85 v1(37.5,20.73)
GPIO_PB14: length 1.6
  TOP w0.16: U1.27 38.25,22.1 38,21.85 v1(38,21.25)
GPIO_PB15: length 2.2
  TOP w0.16: v1(38.5,20.68) 38.5,21.85 38.75,22.1 U1.28
GPIO_PC13: length 41.2
  TOP w0.2: U1.2 42.25,29.15 v2(42,28.9) ; J11.3 14.2,55 29.45,39.75 v2(29.45,39.55)
  BOTTOM w0.2: v2(29.45,39.55) 34.05,34.95 35.25,34.95 41.3,28.9 v2(42,28.9)
GPIO_PC14: length 37.3
  TOP w0.2: v2(41.5,29.65) 41.5,29.85 41.75,30.1 U1.3 ; v2(31.2,39.95) 31.2,40.55 16.75,55 J11.4
  BOTTOM w0.2: v2(31.2,39.95) v2(41.5,29.65)
GPIO_PC15: length 38.9
  TOP w0.2: U1.4 41.25,30.25 40.3,30.25 v2(40.3,28.9)
  BOTTOM w0.2: J11.5 19.25,55 19.25,48.8 33.55,34.5 34.8,34.5 40.3,29 v2(40.3,28.9)
I2C_SCL: length 39.3
  TOP w0.16: 46.35,26.65 45.1,26.65 45,26.75 44.65,26.75
  TOP w0.2: 46.35,26.65 46.8,26.65 47,26.45 54,26.45 55.5,27.95 55.5,34.18 57.7,34.18 58.5,34.98 R19.2 63.75,40.25 74,40.25 J5.2 ; 44.65,26.75 U1.42
I2C_SDA: length 48.4
  TOP w0.16: v1(46.2,27.15) 45.1,27.15 45,27.25 U1.43
  TOP w0.2: 59,37 59.8,37 64.15,41.35 74.95,41.35 75.1,41.2 75.1,38.85 74,37.75 J5.3 ; 59,37 v2(59.2,36.8) ; 59,37 R20.2
  BOTTOM w0.2: v2(59.2,36.8) 60,36 60,27.15 v1(46.2,27.15)
NRST: length 66.8
  TOP w0.2: 39.35,35.3 39.35,36.22 C21.1 ; 39.35,35.3 v2(38.7,35.3) ; 39.35,35.3 39.35,32.45 39.75,32.05 U1.7 ; v2(39.05,42.1) 39.7,41.45 39.7,41.3 R27.2
  BOTTOM w0.2: v2(38.7,35.3) 38.45,35.55 37.75,35.55 37.7,35.5 36.6,35.5 36.2,35.9 36.2,40.1 36.65,40.55 ; 36.65,40.55 37.65,41.55 56.65,41.55 60.45,37.75 60.45,26.9 60.25,26.7 60.25,20.9 61.15,20 J9.5 ; 36.65,40.55 37.5,40.55 v2(39.05,42.1) 38.15,43 J7.1 34.25,43
OSC_IN: length 7.2
  TOP w0.2: U1.5 40.75,32.3 43,32.3 Y1.1 44.7,34 C22.1
OSC_OUT: length 2
  TOP w0.2: R31.1 40.2,32.2 40.25,32.15 U1.6
PA4_SPI_NSS: length 6.5
  TOP w0.2: U1.14 34.8,29.25 34.8,31.15 33.85,32.1 R23.1 33.4,32.9 32.68,33.62 R25.2
PA5_SPI_SCK: length 3.8
  TOP w0.2: R21.1 33.9,30.7 34.38,30.21 34.38,28.75 U1.15
PA6_SPI_MISO: length 2.9
  TOP w0.2: R24.1 33.6,28.25 U1.16
PA7_SPI_MOSI: length 2.5
  TOP w0.2: R22.1 34.35,27.75 U1.17
PA9_UART_TX: length 10
  TOP w0.16: U1.30 39.75,21.75 v1(39.7,21.7)
  TOP w0.2: R16.1 45.6,20.4 v2(46.3,21.1)
  BOTTOM w0.16: 40.95,20.7 41.85,20.7
  BOTTOM w0.2: 40.95,20.7 40.8,20.85 40.8,21.3 40.4,21.7 v1(39.7,21.7) ; 41.85,20.7 41.95,20.8 46,20.8 v2(46.3,21.1)
PA10_UART_RX: length 14.8
  TOP w0.16: v1(40,20.5) 40,21.08 40.2,21.29 40.2,22 40.25,22.05 U1.31
  TOP w0.2: v2(50.1,22.4) 50.12,22.42 R17.1
  BOTTOM w0.2: v2(50.1,22.4) 50.1,22 48.4,20.3 40,20.3 v1(40,20.5)
PA11_SHARED: length 6.5
  TOP w0.2: U1.32 40.75,21.89 40.6,21.75 40.6,20.15 39.4,18.95 R6.1 38,18.4 R13.1
PA12_SHARED: length 6.4
  TOP w0.2: U1.33 41.25,21.9 40.95,21.6 40.95,20 41.1,19.85 R5.1 42.8,18.4 R12.1
SPI_MISO: length 27.9
  TOP w0.2: R24.2 32.05,29 31.65,28.6 v2(31.65,28.2) ; v2(15.7,29.3) 11.3,29.3 7,33.6 J6.4
  BOTTOM w0.2: v2(31.65,28.2) 24.9,28.2 23.8,29.3 v2(15.7,29.3)
SPI_MOSI: length 28.8
  TOP w0.2: J6.3 7,31.1 9.45,28.65 v2(12.65,28.65) ; R22.2 32.05,27 32.05,26.9 v2(32.7,26.25)
  BOTTOM w0.2: v2(12.65,28.65) 15.05,26.25 v2(32.7,26.25)
SPI_NSS: length 27.7
  TOP w0.2: v2(29.8,32.3) 30.3,32.8 31.22,32.8 31.82,32.2 R23.2
  BOTTOM w0.2: v2(29.8,32.3) 29.15,31.65 29.15,31.55 29.1,31.5 11.65,31.5 7,36.15 J6.5
SPI_SCK: length 25.9
  TOP w0.2: v2(31,29.95) 31.75,30.7 R21.2
  BOTTOM w0.2: J6.2 7,28.55 8.4,29.95 v2(31,29.95)
SWCLK: length 17.4
  TOP w0.16: 46.2,24.15 45.1,24.15 45,24.25 U1.37
  TOP w0.2: J9.4 57.82,20.8 v2(57.4,20.8) ; v2(47.95,22.4) 46.2,24.15
  BOTTOM w0.2: v2(47.95,22.4) 48.65,23.1 51,23.1 51.8,22.3 51.8,21.2 57,21.2 v2(57.4,20.8)
SWDIO: length 17.7
  TOP w0.16: U1.34 41.75,21.7 41.52,21.47 v1(41.52,21.25)
  TOP w0.2: v2(44.4,21.95) 44.6,21.75 54.33,21.75 J9.3
  BOTTOM w0.2: v2(44.4,21.95) 44.15,22.2 42,22.2 41.52,21.72 v1(41.52,21.25)
SWO: length 22.2
  TOP w0.16: U1.39 45,25.25 45.1,25.15 v1(46.2,25.15)
  TOP w0.2: J9.6 62.15,21.55 55.95,21.55 v2(54,23.5)
  BOTTOM w0.2: v2(54,23.5) 53.05,23.5 50.7,25.85 47.5,25.85 46.8,25.15 v1(46.2,25.15)
UART_RX: length 25.1
  TOP w0.2: v2(55.7,25.05) 50.13,25.05 R17.2 ; v2(57.8,25.05) 57.92,24.93 68.03,24.93 R18.1 69.35,23.75 J4.3
  BOTTOM w0.2: v2(57.8,25.05) 57.05,24.3 56.45,24.3 v2(55.7,25.05)
UART_TX: length 32.9
  TOP w0.2: R16.2 47.2,19.9 48.5,21.2 52,21.2 52.3,20.9 52.3,19.05 52.55,18.8 54.7,18.8 v2(54.85,18.95)
  BOTTOM w0.2: J4.2 74,26.25 66.3,18.55 55.45,18.55 55.05,18.95 v2(54.85,18.95)
USB_ATTACH_N: length 23.4
  TOP w0.16: v1(39,21.2) 39,21.85 39.25,22.1 U1.29
  TOP w0.2: R10.2 50.2,16.9 v2(50.8,16.3) ; v2(47.95,13.45) 47.95,13.15 Q2.1
  BOTTOM w0.2: v1(39,21.2) 39.1,21.1 39.1,20.4 39.7,19.8 39.7,18.6 43.6,18.6 45.9,16.3 v2(50.8,16.3) v2(47.95,13.45)
USB_CC1: length 5.4
  TOP w0.2: R3.1 36.95,10.1 38.75,8.3 J2.A5
USB_CC2: length 6
  TOP w0.2: v2(44.7,10.1) R4.1 ; J2.B5 v2(41.75,8.3)
  BOTTOM w0.2: v2(41.75,8.3) 41.95,8.5 44,8.5 44.7,9.2 v2(44.7,10.1)
USB_DM: length 12.3
  TOP w0.2: U4.3 U4.4 39.3,8.65 39.25,8.6 ; J2.A7 40.25,8.6 39.25,8.6 ; 39.25,8.6 J2.B7
  TOP w0.26: U4.3 39.3,13.3 40.05,14.04 40.05,15.7 39.4,16.34 R6.2
USB_DP: length 15.2
  TOP w0.2: U4.1 U4.6 41.2,9.05 40.75,8.6 J2.B6 v2(40.75,5.8) ; J2.A6 v2(39.75,5.8) ; 40.45,14.6 R11.2
  TOP w0.26: R5.2 41.1,16.34 40.45,15.7 40.45,14.04 41.2,13.3 U4.1
  BOTTOM w0.2: v2(39.75,5.8) v2(40.75,5.8)
USB_PULLUP_SRC: length 5.2
  TOP w0.2: R11.1 47.85,14.6 Q2.3
USB_VBUS: length 20.3
  TOP w0.2: 42.4,7.97 42.4,8.2 42.7,8.5
  TOP w0.4: J2.B4_A9 42.4,7.97 ; U4.5 v2(40.25,9.3) ; 42.7,8.5 C10.1 43.3,8.6 46,8.6 47.6,7 R7.1 ; v2(36.9,9.2) 36.9,8.9 37.6,8.2 J2.A4_B9
  TOP w0.6: v2(43.8,9.2) C10.1
  BOTTOM w0.4: v2(40.25,9.3) 40.15,9.2 v2(36.9,9.2)
  BOTTOM w0.6: v2(40.25,9.3) v2(43.8,9.2)
XTAL_OUT: length 5.2
  TOP w0.2: 40.3,37.7 40.3,34.87 R31.2 ; 40.3,37.7 C23.1 ; 40.3,37.7 Y1.3

## Copper pours and planes (outline as drawn; the poured copper is in the pictures)
GND on TOP: 77.79,0.5 79.5,2.21 79.5,57.79 77.79,59.5 2.21,59.5 0.5,57.79 0.5,2.21 2.21,0.5 ; 16 cut-outs
GND on L2: 2.21,0.5 0.5,2.21 0.5,57.79 2.21,59.5 77.79,59.5 79.5,57.79 79.5,2.21 77.79,0.5
V3V3 on L3: 2.21,0.5 0.5,2.21 0.5,57.79 2.21,59.5 77.79,59.5 79.5,57.79 79.5,2.21 77.79,0.5

## Text on the board
User.Comments: L60_REPLAY
USER_MECH_DIMENSIONS: TOP LOW PROFILE Z<=2; x10..30 y42..52 | DATUM A=(0,0); TOP +Z; UNITS mm | 80 x 60; C2 x 4; NPTH D2 @ (5,5),(75,5),(75,55),(5,55) | J2 EDGE y=0; OPENING -Y; INSERTION +Y; H<=3.46 | 80.000
